# Altium PCB Stepper-Driver-v2.0.PcbDoc (part 7 of 7)
Units mil, origin at the board's own origin, x right, y up, seen from the top; angles counter-clockwise.
Board outline 5905.51 x 4330.71 mil, 4 copper layers (Top Layer, Layer 1, Layer 2, Bottom Layer), stack 62.047 mil thick; 312 components, 285 nets, 1093 pads, 969 vias.
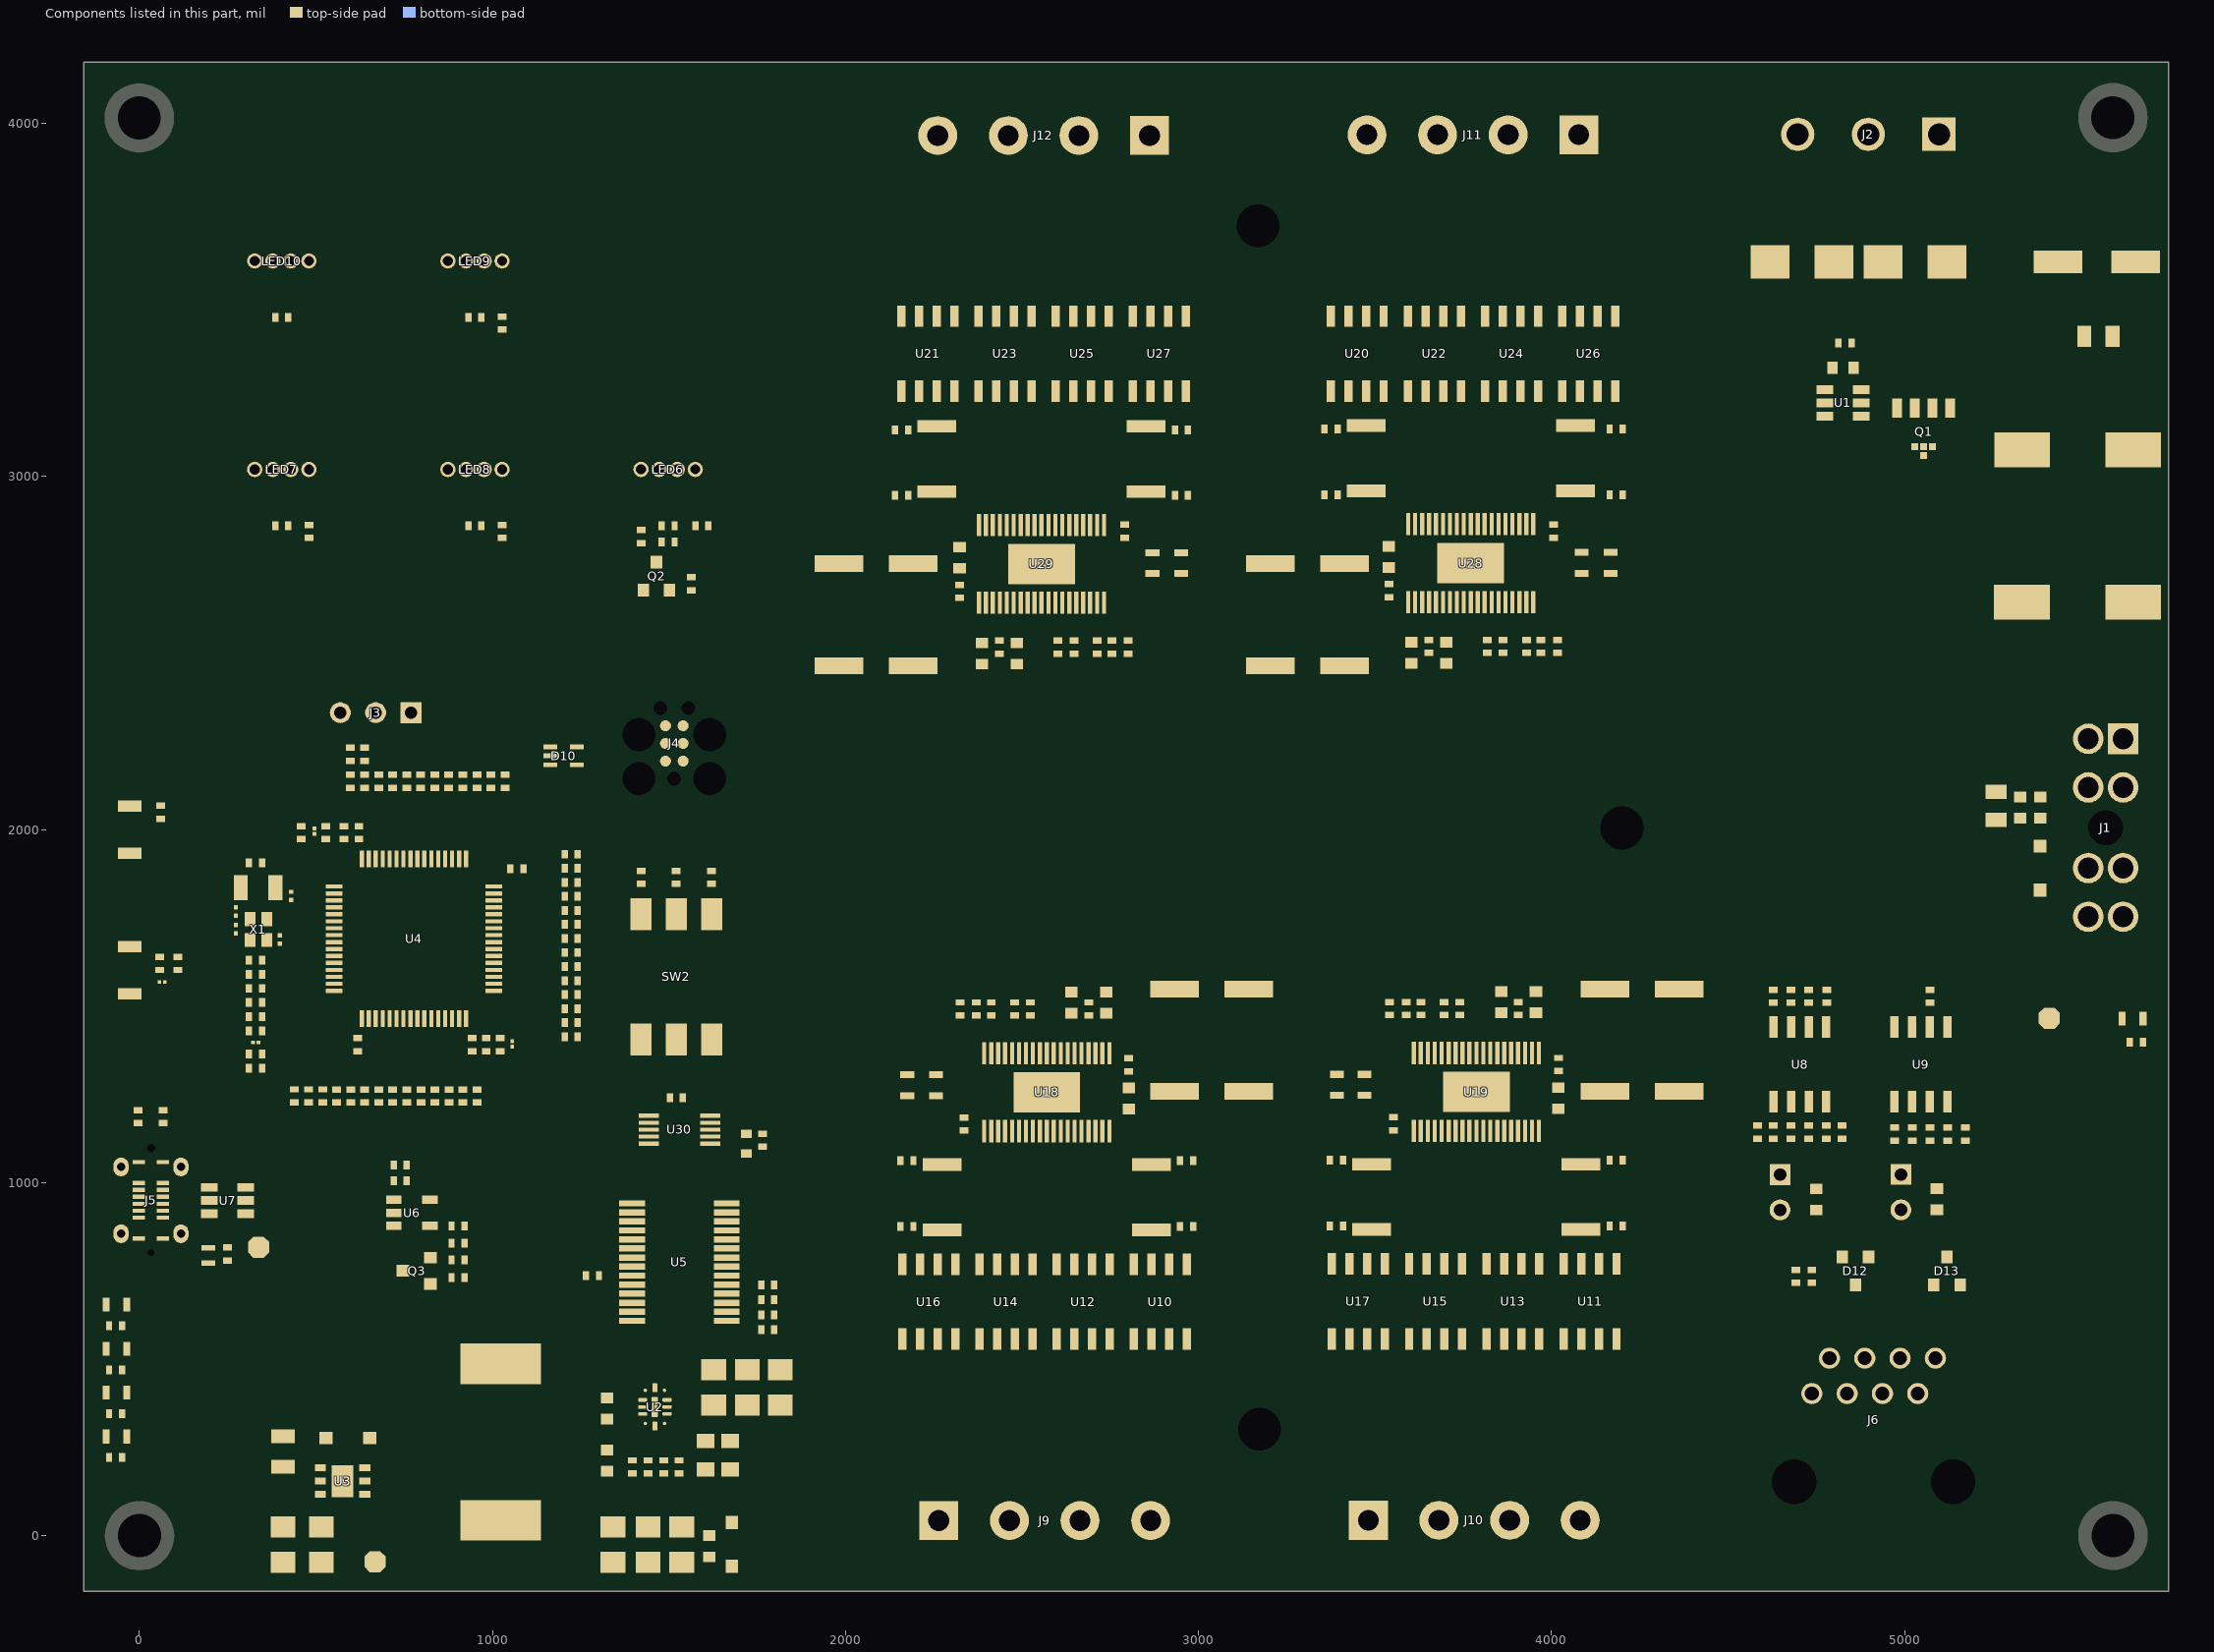
[diagram p7: the components of this part, seen from the top]

## Silkscreen, mask and mechanical layers (free items; w line width, h text height) (continued)
Drill Drawing:
  drawing of 189 lines, arcs and shapes, not listed
  text "Symbol" at -68.17,8339.01 h72
  text "Count" at 437.71,8339.01 h72
  text "Hole Size" at 1087.53,8339.01 h72
  text "Plated" at 2237.19,8339.01 h72
  text "Hole Type" at 2743.07,8339.01 h72
  text "Drill Layer Pair" at 3476.87,8339.01 h72
  text "Via/Pad" at 4976.42,8339.01 h72
  text "Pad Shape" at 5566.27,8339.01 h72
  text "Template" at 6312.07,8339.01 h72
  text "Description" at 7501.72,8339.01 h72
  text "Hole Tolerance (+)" at 8355.48,8339.01 h72
  text "Hole Tolerance (-)" at 9689.09,8339.01 h72
  text "1" at 437.71,8189.01 h60
  text "20.47mil (0.520mm)" at 1087.53,8189.01 h60
  text "NPTH" at 2237.19,8189.01 h60
  text "Round" at 2743.07,8189.01 h60
  text "Top Layer - Bottom Layer" at 3476.87,8189.01 h60
  text "Pad" at 4976.42,8189.01 h60
  text "Rounded" at 5566.27,8189.01 h60
  text "c0hn52" at 6312.07,8189.01 h60
  text "1" at 437.71,8039.01 h60
  text "23.62mil (0.600mm)" at 1087.53,8039.01 h60
  text "NPTH" at 2237.19,8039.01 h60
  text "Slot" at 2743.07,8039.01 h60
  text "Top Layer - Bottom Layer" at 3476.87,8039.01 h60
  text "Pad" at 4976.42,8039.01 h60
  text "Rounded" at 5566.27,8039.01 h60
  text "c0hn60_72" at 6312.07,8039.01 h60
  text "1" at 437.71,7889.01 h60
  text "98.43mil (2.500mm)" at 1087.53,7889.01 h60
  text "NPTH" at 2237.19,7889.01 h60
  text "Round" at 2743.07,7889.01 h60
  text "Top Layer - Bottom Layer" at 3476.87,7889.01 h60
  text "Pad" at 4976.42,7889.01 h60
  text "Rounded" at 5566.27,7889.01 h60
  text "c0hn250p0" at 6312.07,7889.01 h60
  text "2" at 437.71,7739.01 h60
  text "125.98mil (3.200mm)" at 1087.53,7739.01 h60
  text "NPTH" at 2237.19,7739.01 h60
  text "Round" at 2743.07,7739.01 h60
  text "Top Layer - Bottom Layer" at 3476.87,7739.01 h60
  text "Pad" at 4976.42,7739.01 h60
  text "Rounded" at 5566.27,7739.01 h60
  text "c0hn320p0" at 6312.07,7739.01 h60
  text "3" at 437.71,7589.01 h60
  text "39.02mil (0.991mm)" at 1087.53,7589.01 h60
  text "NPTH" at 2237.19,7589.01 h60
  text "Round" at 2743.07,7589.01 h60
  text "Top Layer - Bottom Layer" at 3476.87,7589.01 h60
  text "Pad" at 4976.42,7589.01 h60
  text "Rounded" at 5566.27,7589.01 h60
  text "c0hn99" at 6312.07,7589.01 h60
  text "3" at 437.71,7439.01 h60
  text "62.99mil (1.600mm)" at 1087.53,7439.01 h60
  text "PTH" at 2237.19,7439.01 h60
  text "Round" at 2743.07,7439.01 h60
  text "Top Layer - Bottom Layer" at 3476.87,7439.01 h60
  text "Pad" at 4976.42,7439.01 h60
  text "(Mixed)" at 5566.27,7439.01 h60
  text "(Mixed)" at 6312.07,7439.01 h60
  text "4" at 437.71,7289.01 h60
  text "23.62mil (0.600mm)" at 1087.53,7289.01 h60
  text "PTH" at 2237.19,7289.01 h60
  text "Slot" at 2743.07,7289.01 h60
  text "Top Layer - Bottom Layer" at 3476.87,7289.01 h60
  text "Pad" at 4976.42,7289.01 h60
  text "Rounded" at 5566.27,7289.01 h60
  text "r135_110h60_85r55" at 6312.07,7289.01 h60
  text "4" at 437.71,7139.01 h60
  text "93.50mil (2.375mm)" at 1087.53,7139.01 h60
  text "NPTH" at 2237.19,7139.01 h60
  text "Round" at 2743.07,7139.01 h60
  text "Top Layer - Bottom Layer" at 3476.87,7139.01 h60
  text "Pad" at 4976.42,7139.01 h60
  text "Rounded" at 5566.27,7139.01 h60
  text "c0hn238" at 6312.07,7139.01 h60
  text "7" at 437.71,6989.01 h60
  text "35.43mil (0.900mm)" at 1087.53,6989.01 h60
  text "PTH" at 2237.19,6989.01 h60
  text "Round" at 2743.07,6989.01 h60
  text "Top Layer - Bottom Layer" at 3476.87,6989.01 h60
  text "Pad" at 4976.42,6989.01 h60
  text "(Mixed)" at 5566.27,6989.01 h60
  text "(Mixed)" at 6312.07,6989.01 h60
  text "7" at 437.71,6839.01 h60
  text "122.05mil (3.100mm)" at 1087.53,6839.01 h60
  text "PTH" at 2237.19,6839.01 h60
  text "Round" at 2743.07,6839.01 h60
  text "Top Layer - Bottom Layer" at 3476.87,6839.01 h60
  text "Pad" at 4976.42,6839.01 h60
  text "Rounded" at 5566.27,6839.01 h60
  text "(Mixed)" at 6312.07,6839.01 h60
  text "8" at 437.71,6689.01 h60
  text "39.37mil (1.000mm)" at 1087.53,6689.01 h60
  text "PTH" at 2237.19,6689.01 h60
  text "Round" at 2743.07,6689.01 h60
  text "Top Layer - Bottom Layer" at 3476.87,6689.01 h60
  text "Pad" at 4976.42,6689.01 h60
  text "Rounded" at 5566.27,6689.01 h60
  text "c152h100m163mx163p0" at 6312.07,6689.01 h60
  text "8" at 437.71,6539.01 h60
  text "59.06mil (1.500mm)" at 1087.53,6539.01 h60
  text "PTH" at 2237.19,6539.01 h60
  text "Round" at 2743.07,6539.01 h60
  text "Top Layer - Bottom Layer" at 3476.87,6539.01 h60
  text "Pad" at 4976.42,6539.01 h60
  text "(Mixed)" at 5566.27,6539.01 h60
  text "(Mixed)" at 6312.07,6539.01 h60
  text "16" at 437.71,6389.01 h60
  text "59.06mil (1.500mm)" at 1087.53,6389.01 h60
  text "PTH" at 2237.19,6389.01 h60
  text "Slot" at 2743.07,6389.01 h60
  text "Top Layer - Bottom Layer" at 3476.87,6389.01 h60
  text "Pad" at 4976.42,6389.01 h60
  text "(Mixed)" at 5566.27,6389.01 h60
  text "(Mixed)" at 6312.07,6389.01 h60
  text "20" at 437.71,6239.01 h60
  text "28.35mil (0.720mm)" at 1087.53,6239.01 h60
  text "PTH" at 2237.19,6239.01 h60
  text "Round" at 2743.07,6239.01 h60
  text "Top Layer - Bottom Layer" at 3476.87,6239.01 h60
  text "Pad" at 4976.42,6239.01 h60
  text "Rounded" at 5566.27,6239.01 h60
  text "c110h72m120mx120p0" at 6312.07,6239.01 h60
  text "24" at 437.71,6089.01 h60
  text "7.87mil (0.200mm)" at 1087.53,6089.01 h60
  text "PTH" at 2237.19,6089.01 h60
  text "Round" at 2743.07,6089.01 h60
  text "Top Layer - Bottom Layer" at 3476.87,6089.01 h60
  text "Via" at 4976.42,6089.01 h60
  text "Rounded" at 5566.27,6089.01 h60
  text "v40h20" at 6312.07,6089.01 h60
  text "A" at -97.26,6079.02 h66.67
  text "945" at 437.71,5939.01 h60
  text "11.81mil (0.300mm)" at 1087.53,5939.01 h60
  text "PTH" at 2237.19,5939.01 h60
  text "Round" at 2743.07,5939.01 h60
  text "Top Layer - Bottom Layer" at 3476.87,5939.01 h60
  text "Via" at 4976.42,5939.01 h60
  text "Rounded" at 5566.27,5939.01 h60
  text "v60h30m0mx0" at 6312.07,5939.01 h60
  text "1054 Total" at 437.71,5789.01 h60
  text "Slot definitions :" at -68.17,5644.03 h60
  text "Routed Path Length" at 964.52,5644.03 h60
  text "= Calculated from tool start centre position to tool end centre position." at 2067.19,5644.03 h60
  text "Hole Length" at 964.52,5544.06 h60
  text "= Routed Path Length + Tool Size = Slot length as defined in the PCB layout" at 1657.32,5544.06 h60

## Dimensions
5747.66,4173.6 to 5747.66,-157.11 on Dimensions
-157.85,4173.6 to 5747.66,4173.6 on Dimensions

## Text inside footprints (layer, text, board x,y; h text height)
C48: Top Overlay "+" at 2877.27,1575.27 h25
C49: Top Overlay "+" at 4096.14,1575.27 h25
C50: Top Overlay "+" at 2877.27,1286.27 h25
C51: Top Overlay "+" at 4096.14,1286.27 h25
C64: Top Overlay "+" at 2245.6,2725.41 h25 r180
C65: Top Overlay "+" at 3467.56,2725.84 h25 r180
C66: Top Overlay "+" at 2245.6,2436.42 h25 r180
C67: Top Overlay "+" at 3467.56,2436.85 h25 r180
J1: Top Overlay "1" at 5610.38,2325.17 h31.5 r270
J5: Top Overlay "A1" at 2.4,801.91 h19.68 r90; Top Overlay "B1" at 81.4,1073.91 h19.68 r90
SW2: Top Overlay "ON" at 1641.21,1505.27 h25 r180; Top Overlay "1" at 1611.41,1657.28 h30; Top Overlay "2" at 1512.41,1656.28 h30; Top Overlay "3" at 1414.41,1655.28 h30